# Altium PCB Tracker-NB-IOT-v1.1.PcbDoc (part 3 of 3)
Units mm, origin at the board's own origin, x right, y up, seen from the top; angles counter-clockwise.
Board outline 60 x 36.48 mm, 4 copper layers (Top Layer, Mid Layer 1, Mid Layer 2, Bottom Layer), stack 1.514 mm thick; 117 components, 86 nets, 443 pads, 352 vias.
Unrouted connection lines stored in the file: 3.
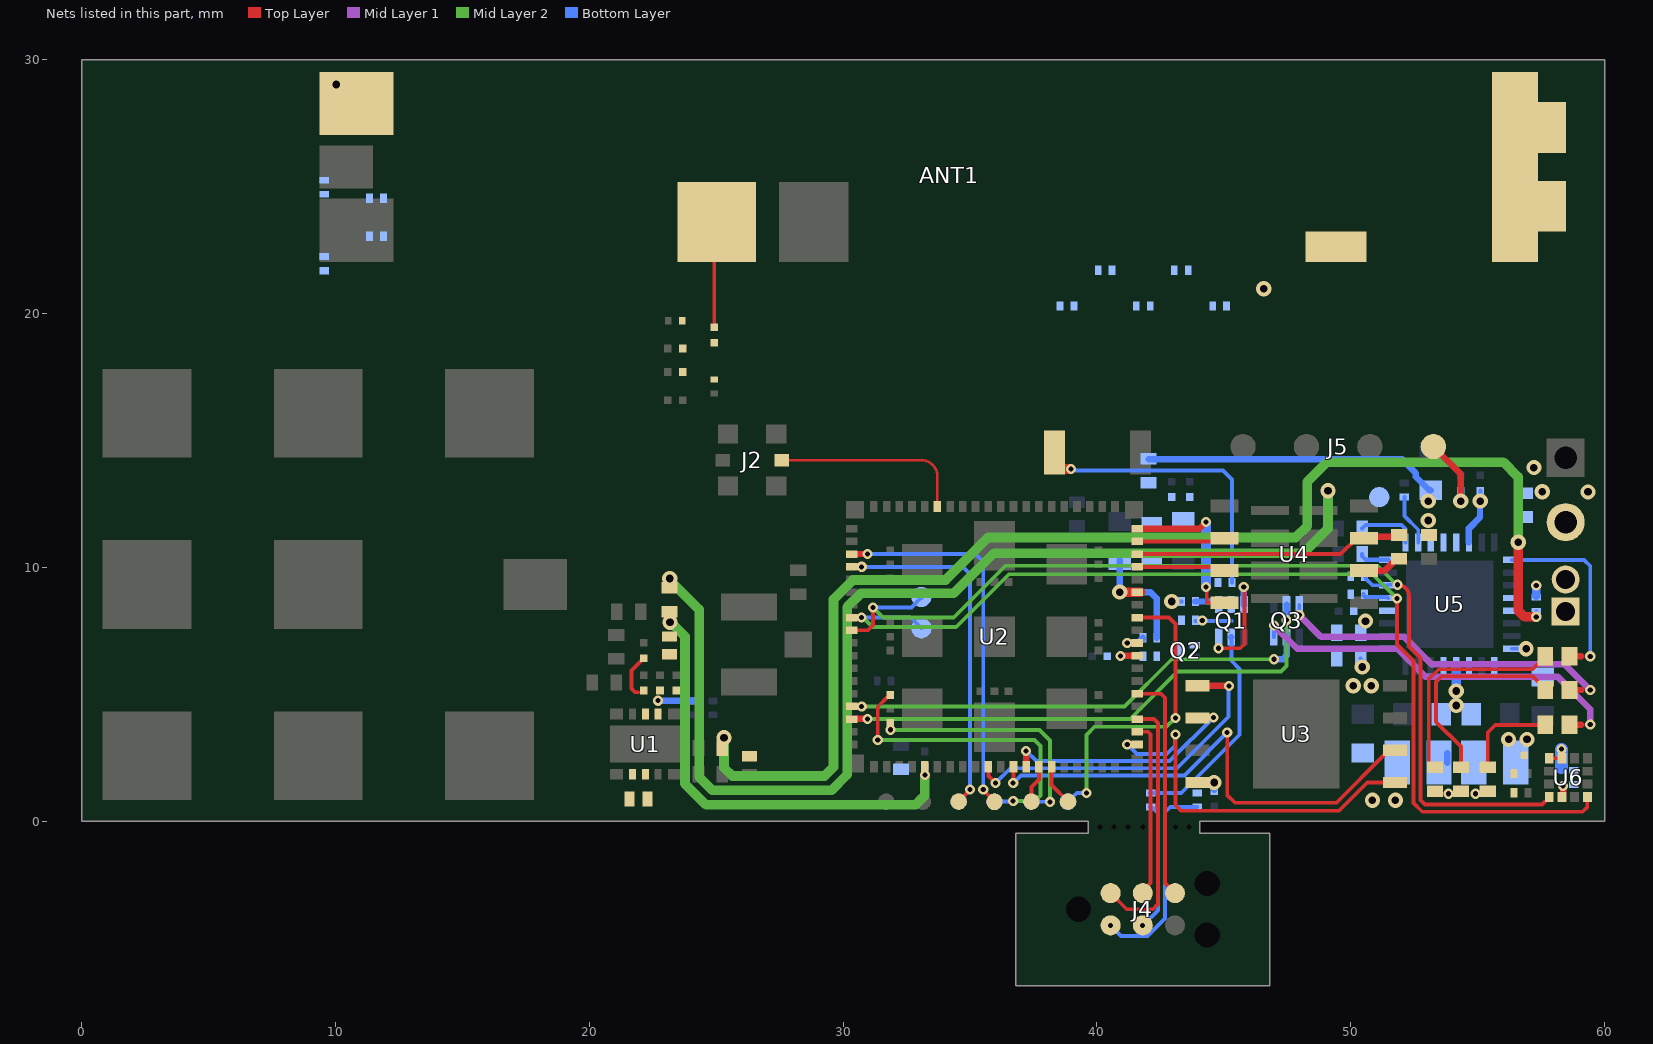
[diagram p4: the nets of this part, all layers, seen from the top]

## Via types
v1: diameter 0.4, hole 0.2, Top Layer to Bottom Layer, tented both sides, 308 vias
v2: diameter 0.6, hole 0.3, Top Layer to Bottom Layer, tented both sides, 30 vias
v3: diameter 0.5, hole 0.25, Top Layer to Bottom Layer, tented both sides, 14 vias

## Nets (pads, with @x,y where several pads share a name; then routed paths per layer and width w, separated by ;. In a path a pad name is that pad's centre, name@x,y a point inside that pad or via, vN(x,y) a via of type N, cw(c..) or ccw(c..) an arc to the next point about the centre after c; other vN are vias at no path point) (continued)
LED1: Q3.2 U2.56 | length 18.8
  Top Layer w0.254: U2.56@30.338,4.523 v1(30.73,4.522)
  Mid Layer 2 w0.152: v1(30.73,4.522) 41.088,4.522 42.946,6.379 v1(46.97,6.379)
  Bottom Layer w0.254: v1(46.97,6.379) 47.322,6.379 47.47,6.528 Q3.2@47.47,7.38
LED2: Q3.5 U2.57 | length 20.3
  Top Layer w0.254: U2.57@30.338,4.023 30.342,4.027 30.955,4.027 v1(30.96,4.031)
  Mid Layer 2 w0.152: v1(30.96,4.031) 41.315,4.031 43.174,5.89 47.252,5.89 47.47,6.108 v1(47.47,7.919)
  Bottom Layer w0.254: v1@47.47,8.071 Q3.5@47.47,8.529
LTE_RF1: J2.1 U2.35 | length 7.7
  Top Layer w0.101: J2.1@27.576,14.224 33.078,14.224 cw(c33.078,13.589) 33.713,13.589 U2.35@33.713,12.398
MEM_CS: U2.2 U3.1 | length 15
  Top Layer w0.152: v1(43.095,3.41) 43.095,0.629 43.311,0.412 49.541,0.412 50.652,1.524 U3.1@51.749,1.524
  Top Layer w0.254: v1@41.196,3.023 U2.2@41.588,3.022
  Bottom Layer w0.152: v1(41.195,3.023) 41.575,2.644 42.749,2.644 43.087,2.981 43.087,3.402 v1(43.095,3.41)
MEM_MISO: U2.72 U3.2 | length 20
  Top Layer w0.152: v1@36.7,1.503 36.706,1.51 36.706,2.141 U2.72@36.713,2.148 ; v1(45.132,3.491) 45.132,1.031 45.438,0.725 49.435,0.725 51.355,2.644 51.355,2.65 51.499,2.794 U3.2@51.749,2.794
  Bottom Layer w0.152: v1@36.7,1.503 36.701,1.503 37.003,1.805 43.446,1.805 v1(45.132,3.491)
  other v1: 36.7,1.5
MEM_MOSI: U2.70 U3.5 | length 13.5
  Top Layer w0.152: U2.70@35.713,2.148 35.721,2.139 35.721,1.783 36.004,1.5 v1(36.008,1.5)
  Top Layer w0.254: U3.5@43.959,5.334 43.965,5.327 45.194,5.327 v1(45.201,5.321)
  Bottom Layer w0.152: v1(36.008,1.5) 36.592,2.085 43.156,2.085 45.185,4.115 45.185,5.306 v1(45.201,5.321)
MEM_SCK: U2.73 U3.6 | length 9.5
  Top Layer w0.254: v1(37.204,2.771) 37.209,2.767 37.209,2.152 U2.73@37.213,2.148 ; U3.6@43.959,4.064 43.971,4.076 44.577,4.076 v1(44.589,4.089)
  Bottom Layer w0.152: v1(37.204,2.771) 37.611,2.364 42.865,2.364 v1(44.589,4.089)
NetANT1_1: ANT1.1 C12.2 L4.2 | length 4.2
  Top Layer w0.152: C12.2@24.919,19.455 24.919,23.499 cw(c25.024,23.499) ANT1.1@25.024,23.604
NetANT1_4: ANT1.4 R7.2 R8.1 R8.2 R9.1 R9.2 R10.1 R10.2
  other v2: 46.574,20.979
NetANT1_5: ANT1.5 R11.2 R12.1 R13.2 R14.1 R14.2
  other v2: 10.024,29.029
NetC6_2: C6.2 C7.2 FB1.1 U1.3 | length 1.7
  Top Layer w0.152: 21.918,5.079 21.798,5.079 21.656,5.221 21.656,5.936 C7.2@22.146,6.427
NetC11_2: C11.2 FB2.2 R5.2 U2.14 | length 5.2
  Top Layer w0.381: v2@40.902,9.022 U2.14@41.588,9.022 U2.14@41.718,9.022
  Bottom Layer w0.254: C11.2@40.898,10.287 v2(40.898,9.025) 42.11,9.025 42.359,8.776 R5.2@42.359,7.222
NetC12_1: C12.1 C16.2 C32.2 L3.2
NetC13_2: C13.2 C14.2 R15.2 U1.2 | length 1.4
  Bottom Layer w0.152: v1@22.708,4.741 v1(22.708,4.747)
  Bottom Layer w0.254: v1@22.708,4.741 R15.2@24.11,4.741
NetC21_2: C21.2 R19.2 U2.9 | length 0.7
  Top Layer w0.254: v1(40.924,6.502) 40.934,6.512 41.578,6.512 U2.9@41.588,6.522
NetJ3_2: J3.2 J6.2 R16.1
NetJ4_1: J4.1 R27.2 | length 8.1
  Top Layer w0.254: v1(40.538,-4.115) J4.1@40.538,-4.106
  Bottom Layer w0.152: v1(40.538,-4.115) 40.942,-4.518 41.996,-4.518 42.684,-3.83 42.684,0.355 42.888,0.559 R27.2@43.945,0.559
NetJ4_3: J4.3 R28.2 | length 5.1
  Top Layer w0.254: v1(41.801,-4.115) 41.801,-4.113 J4.3@41.808,-4.106
  Bottom Layer w0.152: v1(41.801,-4.115) 42.403,-3.513 42.403,0.325 42.228,0.5 42.176,0.5 R28.2@42.117,0.559
NetL2_1: L2.1 U1.7
NetL2_2: L2.2 U1.8
NetLED1_1: LED1.1 R17.1 | length 8.4
  Top Layer w0.152: R17.1@54.342,2.121 54.342,2.937 53.364,3.915 53.364,5.484 53.589,5.709 57.163,5.709 57.419,5.453 57.434,5.453 57.668,5.219 LED1.1@57.668,5.169
NetLED1_2: LED1.2 Q3.6 | length 13.6
  Top Layer w0.254: LED1.2@58.618,5.169 59.083,5.169
  Mid Layer 1 w0.254: v1(47.97,8.122) 48.832,7.261 52.106,7.261 53.19,6.177 58.43,6.177 v1(59.438,5.169)
  Bottom Layer w0.152: v1(47.97,8.122) Q3.6@47.97,8.529
NetLED2_1: LED2.1 R18.1 | length 3.8
  Top Layer w0.152: R18.1@55.397,2.121 55.397,3.49 55.696,3.789 57.653,3.789 LED2.1@57.668,3.804
NetLED2_2: LED2.2 Q3.3 | length 15.4
  Top Layer w0.254: LED2.2@58.618,3.804 59.083,3.804
  Mid Layer 1 w0.254: v1(46.97,7.711) 47.891,6.79 51.846,6.79 52.954,5.682 58.163,5.682 59.438,4.407 v1(59.438,3.804)
  Bottom Layer w0.152: Q3.3@46.97,7.253 v1(46.97,7.711)
NetLED3_1: LED3.1 R38.1 | length 8.6
  Top Layer w0.152: R38.1@53.318,2.121 53.229,2.121 53.077,2.273 53.077,2.362 53.077,5.597 53.468,5.988 57.16,5.988 LED3.1@57.668,6.496
NetLED3_2: LED3.2 U5.25 | length 7.2
  Top Layer w0.254: LED3.2@58.618,6.496 59.083,6.496
  Bottom Layer w0.152: U5.25@56.343,10.295 59.195,10.295 59.438,10.052 v1(59.438,6.496)
NetQ1_3: Q1.3 Q1.6 Q2.1 | length 3.9
  Top Layer w0.152: v1(44.791,6.812) 45.648,6.812 45.813,6.977 45.813,9.205 v1(45.785,9.233)
  Bottom Layer w0.254: v1@45.785,9.106 45.791,9.1 45.791,8.534 Q1.6@45.796,8.529
NetQ1_4: Q1.4 R1.1 R4.2 | length 1
  Bottom Layer w0.254: R1.1@43.88,8.656 44.773,8.656 44.796,8.633 Q1.4@44.796,8.529
NetR5_1: R5.1 U2.10 | length 1.1
  Top Layer w0.254: v1@41.196,7.023 U2.10@41.588,7.022
  Bottom Layer w0.254: v1(41.195,7.023) 41.223,7.051 41.639,7.051 41.751,7.164 41.801,7.164 41.809,7.172 R5.1@41.809,7.222
NetR6_1: R6.1 TP5.1
NetR6_2: R6.2 R7.1
NetR11_1: R11.1 TP6.1
NetR12_2: R12.2 R13.1
NetR24_2: R24.2 TP3.1 U5.18 | length 2
  Bottom Layer w0.152: R24.2@52.112,12.769 52.112,12.028 52.659,11.482 U5.18@52.659,10.98
NetR29_2: R29.2 U5.17 | length 2.4
  Bottom Layer w0.152: R29.2@50.451,11.526 50.451,11.533 50.591,11.672 51.998,11.672 52.159,11.512 U5.17@52.159,10.98
NetR30_2: R30.2 U5.16 | length 1.2
  Bottom Layer w0.152: R30.2@50.451,10.524 50.451,10.448 R30.2@50.604,10.295
  Bottom Layer w0.178: R30.2@50.604,10.295 U5.16@51.474,10.295
NetR34_1: R34.1 U6.2 | length 0.3
  Top Layer w0.152: U6.2@58.322,0.958 U6.2@58.344,0.979 ; v1@58.344,1.371 v1(58.365,1.392) v1@58.366,1.391
  Top Layer w0.254: U6.2@58.366,1.118 v1@58.366,1.391
NetSB1_1: SB1.1 U4.2 | length 1.6
  Top Layer w0.254: U4.2@50.525,9.875 51.348,9.875 51.707,10.234 51.798,10.234 SB1.1@51.9,10.335
NetTP18_1: TP18.1 U2.12 | length 12.2
  Top Layer w0.152: U2.12@41.588,8.022 42.839,8.022 43.089,7.772 v1(43.089,4.064)
  Mid Layer 2 w0.152: v1(39.584,1.11) 39.584,3.394 39.913,3.723 42.748,3.723 v1(43.089,4.064)
  Bottom Layer w0.152: TP18.1@38.861,0.768 39.202,1.11 v1(39.584,1.11)
NetTP23_1: TP23.1 U2.99 | length 12.4
  Top Layer w0.152: v1(31.363,3.199) 31.363,4.51 31.752,4.899 31.789,4.899 U2.99@31.863,4.973
  Mid Layer 2 w0.152: v1(31.363,3.199) 37.541,3.199 37.775,2.965 37.775,1.003 37.568,0.796 v1(36.7,0.796)
  Bottom Layer w0.152: TP23.1@35.959,0.766 35.973,0.779 36.683,0.779 v1(36.7,0.796)
NetTP24_1: TP24.1 U2.101 | length 9.9
  Top Layer w0.152: v1(31.863,3.602) U2.101@31.863,3.873
  Mid Layer 2 w0.152: v1(31.863,3.602) 31.87,3.595 37.73,3.595 38.15,3.175 v1(38.15,0.763)
  Bottom Layer w0.152: TP24.1@37.415,0.774 37.422,0.767 38.147,0.767 v1(38.15,0.763)
nRESET: Q2.3 R2.1 R19.1
RESET: Q1.2 Q1.5 R2.2 R4.1 R28.1 SW4.1 | length 21.6
  Top Layer w0.254: SW4.1@38.322,14.525 38.322,14.156 SW4.1@38.655,13.823
  Top Layer w0.381: SW4.1@38.655,13.873 v1(38.973,13.873)
  Bottom Layer w0.152: v1@38.973,13.823 38.981,13.814 44.969,13.814 45.32,13.462 R4.1@45.32,9.403 ; R28.1@42.117,1.109 43.32,1.109 45.615,3.404 45.615,6.002 45.296,6.321 Q1.2@45.296,7.253 ; R2.2@43.88,7.891 45.296,7.891
  Bottom Layer w0.254: Q1.2@45.292,7.249 Q1.2@45.296,7.253
  other v1: 44.15,7.909
SCL: R32.2 TP22.1 U2.50 U5.14 U6.1 | length 41.4
  Top Layer w0.152: U2.50@30.338,7.523 30.973,7.523 31.182,7.731 31.182,8.423 v1(31.179,8.426) ; v1(51.845,9.317) cw(c51.845,8.866) 52.296,8.866 52.296,6.885 52.751,6.43 52.751,0.833 52.933,0.65 57.539,0.65 57.822,0.933 U6.1@57.822,0.958
  Mid Layer 2 w0.152: v1(31.179,8.426) 31.577,8.028 34.356,8.028 36.394,10.066 51.052,10.066 51.802,9.317 v1(51.845,9.317)
  Bottom Layer w0.152: v1(31.179,8.426) 32.691,8.426 33.049,8.784 TP22.1@33.084,8.784 ; R32.2@50.549,9.651 50.607,9.592 50.607,9.542 50.854,9.295 U5.14@51.474,9.295 51.495,9.317 v1(51.845,9.317)
SDA: R31.2 TP21.1 U2.49 U5.13 U6.4 | length 42.3
  Top Layer w0.152: v1(51.824,8.768) 51.824,6.963 52.471,6.315 52.471,0.717 52.818,0.37 59.128,0.37 59.322,0.565 U6.4@59.322,0.958
  Top Layer w0.254: U2.49@30.338,8.023 v1(30.728,8.023)
  Mid Layer 2 w0.152: v1@30.728,8.031 30.777,8.031 31.157,7.651 34.456,7.651 36.534,9.729 50.863,9.729 v1(51.824,8.768)
  Bottom Layer w0.152: v1(30.728,8.023) 32.663,8.023 TP21.1@33.084,7.602 ; R31.2@50.498,8.948 50.498,8.898 50.557,8.839 51.43,8.839 U5.13@51.474,8.795
SIM_1V8: U2.19 U4.8 | length 6.7
  Top Layer w0.152: v1(44.301,9.233) cw(c44.301,9.207) 44.326,9.207 44.326,8.656 ccw(c44.377,8.656) 44.377,8.605 U4.8@45.025,8.605
  Top Layer w0.254: U2.19@41.588,11.523 44.035,11.523 v1(44.296,11.784)
  Bottom Layer w0.152: v1(44.296,11.784) v1@44.298,11.781 ; v1@44.298,9.235 v1(44.301,9.233)
  Bottom Layer w0.381: v1@44.298,9.235 v1@44.298,11.781
SIM_CLK: U2.18 U4.6 | length 3.3
  Top Layer w0.152: U2.18@41.588,11.022 U4.6@44.898,11.022
SIM_IO: SB1.2 U2.17 U4.3 | length 10.6
  Top Layer w0.152: U2.17@41.588,10.522 49.603,10.522 50.225,11.145 U4.3@50.525,11.145
  Top Layer w0.254: U4.3@50.525,11.145 50.593,11.213 51.837,11.213 SB1.2@51.9,11.275
SIM_RST: U2.16 U4.7 | length 3.5
  Top Layer w0.152: U2.16@41.588,10.022 44.878,10.022 U4.7@45.025,9.875
SW1: L5.2 U5.3
SW2: L6.2 U5.5 | length 0.4
  Bottom Layer w0.254: L6.2@53.809,2.31 L6.2@53.809,2.67
SWDCLK: J4.4 U2.3 | length 7
  Top Layer w0.152: U2.3@41.588,3.522 42.019,3.522 42.117,3.424 42.117,-2.429 41.808,-2.738 J4.4@41.808,-2.836
SWDIO: J4.2 U2.4 | length 10.2
  Top Layer w0.152: J4.2@40.538,-2.836 41.173,-3.471 42.202,-3.471 42.405,-3.268 42.405,3.864 42.247,4.022 U2.4@41.588,4.022
SWO: J4.6 U2.6 | length 9
  Top Layer w0.152: U2.6@41.588,5.022 42.526,5.022 42.684,4.864 42.684,-2.442 J4.6@43.078,-2.836
UART1_CTS: TP9.1 U2.75 | length 1.7
  Top Layer w0.152: U2.75@38.213,2.148 38.213,1.423 TP9.1@38.87,0.766
UART1_RTS: TP7.1 U2.74 | length 1.5
  Top Layer w0.152: TP7.1@37.416,0.794 37.418,0.796 37.418,1.341 37.713,1.635 U2.74@37.713,2.148
UART1_RX: TP19.1 U2.44 | length 14.9
  Top Layer w0.152: v1(35.52,1.242) 35.52,1.224 35.956,0.788 TP19.1@35.963,0.788
  Top Layer w0.254: U2.44@30.338,10.523 30.342,10.527 30.957,10.527 v1(30.961,10.531)
  Bottom Layer w0.152: v1(30.961,10.531) 35.213,10.531 35.52,10.224 v1(35.52,1.242)
UART1_TX: TP20.1 U2.45 | length 13.9
  Top Layer w0.152: TP20.1@34.55,0.796 34.558,0.796 34.993,1.232 v1(34.993,1.25)
  Top Layer w0.254: U2.45@30.338,10.023 v1(30.73,10.022)
  Bottom Layer w0.152: v1(30.73,10.022) 34.715,10.022 34.993,9.744 v1(34.993,1.25)
VBAT: C27.2 J6.1 R16.2 U5.19
  other v2: 53.059,11.845 57.545,12.983 59.348,12.975 57.217,13.931
VBUS: C22.2 J5.1 U5.21 | length 2.6
  Top Layer w0.254: J5.1@53.257,14.759 54.336,13.68 v2(54.336,12.613)
VDD: C20.2 R1.2 R20.2 R27.1 U3.8 | length 1.7
  Top Layer w0.254: U3.8@43.959,1.524 U3.8@43.959,1.524 44.614,1.524 v2(44.615,1.523)
  Bottom Layer w0.152: v2(42.944,8.656) R1.2@43.33,8.656 ; R20.2@50.388,6.404 50.455,6.337 v2(50.455,6.074)
  Bottom Layer w0.254: C20.2@44.615,1.236 v2(44.615,1.523)
VDD_1V8: C28.2 L5.1 R20.1 R23.1 R25.1 U5.1 | length 42.9
  Mid Layer 2 w0.381: v2@23.162,9.511 24.324,8.35 24.324,1.737 24.847,1.214 29.543,1.214 30.158,1.829 30.158,8.432 30.703,8.977 34.349,8.977 35.935,10.563 48.137,10.563 49.103,11.529 v2(49.103,13.019)
  other v2: 56.222,3.221 56.944,3.221 50.102,5.335 50.807,5.335 23.168,9.563
VDD_3V0: C29.2 L6.1 R17.2 R18.2 R33.2 R38.2 U5.28 U5.32 | length 1
  Bottom Layer w0.152: U5.32@56.343,6.795 56.346,6.793 56.907,6.793 v2(56.909,6.791)
  Bottom Layer w0.33: R33.2@57.309,8.873 v1(57.309,9.282)
  other v1: 53.851,1.08 54.916,1.08
  other v2: 50.853,0.823 51.76,0.828
VDD_GNSS: C1.2 L1.2 R33.1 U5.29 | length 49.6
  Top Layer w0.152: C1.2@25.241,2.881 25.241,3.224 v2(25.305,3.288)
  Top Layer w0.381: v2(56.597,10.992) 56.597,8.306 56.851,8.052 v1(57.309,8.052)
  Mid Layer 2 w0.381: v2(25.305,3.288) 25.305,2.104 25.63,1.779 29.261,1.779 29.62,2.137 29.62,8.742 30.382,9.504 34.038,9.504 35.713,11.179 47.833,11.179 48.287,11.634 48.287,13.378 49.056,14.147 56.013,14.147 56.597,13.563 v2(56.597,10.992)
  Bottom Layer w0.152: v1(57.309,8.052) R33.1@57.309,8.27
VDD_GPIO: C17.2 C18.2 FB1.2 R23.2 U2.65 | length 17.7
  Top Layer w0.254: U2.65@33.213,2.148 33.216,2.145 33.216,1.818 v1(33.218,1.815)
  Mid Layer 2 w0.381: v2(23.176,7.841) 23.204,7.841 23.771,7.274 23.771,1.473 24.603,0.641 32.849,0.641 33.218,1.01 v1(33.218,1.815)
VDD_IMCU: C30.2 C31.2 R25.2 R31.1 R32.1 R34.2 R35.1 R36.1 U5.12 U6.9 U6.10 | length 1.6
  Top Layer w0.152: U6.10@57.822,2.478 U6.9@58.322,2.478 ; U6.9@58.308,2.492 v1(58.308,2.836)
  Bottom Layer w0.508: 58.308,2.105 v1(58.308,2.836)
  other v2: 50.582,7.884
VDD_nRF: C8.2 C9.2 C10.2 FB2.1 R39.2
VSYS: C24.2 C25.2 C26.2 R39.1 U5.4 U5.20 | length 12.8
  Bottom Layer w0.254: R39.1@42.033,14.255 52.026,14.255 52.566,13.715 52.566,13.573 53.094,13.044 C26.2@53.158,13.044
  Bottom Layer w0.381: v2@54.158,4.986 54.158,5.037 U5.4@54.158,6.11
  other v2: 54.158,4.559 54.158,5.128 53.059,12.613
VUSB: C23.2 U5.22 | length 2
  Bottom Layer w0.152: v2(55.107,12.613) C23.2@55.107,13.024
  Bottom Layer w0.254: U5.22@54.659,10.98 54.659,11.536 55.094,11.971 v2@55.094,12.4
pads on no net: ANT1.6 ANT1.7 J4.MP1 J4.MP2 J4.MP3 U1. U2.5 U2.8 U2.11 U2.21 U2.22 U2.23 U2.26 U2.27 U2.28 U2.29 U2.31 U2.32 U2.33 U2.37 U2.47 U2.48 U2.58 U2.59 U2.61 U2.62 U2.63 U2.64 U2.69 U2.77 U2.78 U2.81 U2.82 U2.83 U2.84 U2.85 U2.86 U2.87 U2.88 U2.89 U2.90 U2.91 U2.92 U2.93 U2.94 U2.95 U2.96 U2.97 U2.98 U2.100 U2.102 U2.103 U2.104 U3.3 U3.7 U4.0 U4.4 U4.5 U5.7 U5.8 U5.9 U5.10 U5.11 U5.15 U5.26 U5.27

## Polygon pours and split planes (outlines as drawn)
GND on Mid Layer 2 "GND_L03_P022" (solid, pour order 22): 0,18.795 0,13.801 0,0 39.75,0 39.75,-0.476 36.801,-0.476 36.801,-6.477 46.801,-6.477 46.801,-0.478 43.854,-0.478 43.854,0 60,0 60,16.002 58.623,16.002 58.623,18.795
VDD_1V8 on Mid Layer 2 "VDD_1V8_L03_P011" (solid, pour order 11): 57.262,3.541 57.525,3.279 57.525,0.968 49.48,0.968 49.48,5.997 51.406,5.997 51.406,3.541
VDD on Mid Layer 2 "VDD_L03_P013" (solid, pour order 13): 49.48,0.827 49.48,2.295 49.48,5.997 51.406,5.997 51.406,7.018 49.779,7.018 49.779,9.729 42.405,9.729 42.405,0.722 49.375,0.722
VSYS on Mid Layer 2 "VSYS_L03_P016" (solid, pour order 16): 52.77,12.135 53.364,11.54 53.364,4.242 56.28,4.242 56.28,12.498 56.28,13.527 52.77,13.527
VBAT on Mid Layer 2 "VBAT_L03_P019" (solid, pour order 19): 57.833,9.525 59.111,9.525 59.111,11.891 58.471,12.531 58.47,12.53 56.43,12.53 56.43,16.002 60,16.002 60,6.496 57.833,6.496
VDD_IMCU on Mid Layer 2 "VDD_IMCU_L03_P020" (solid, pour order 20): 57.892,4.242 58.512,3.622 58.512,2.538 57.662,2.538 57.662,3.141 57.127,3.676 51.406,3.676 51.406,7.018 49.779,7.018 49.779,9.729 53.364,9.729 53.364,4.242
VDD_3V0 on Mid Layer 2 "VDD_3V0_L03_P001" (solid, pour order 1): 57.873,4.261 58.308,3.826 58.308,2.515 57.668,2.515 57.668,1.624 50.126,1.624 50.066,1.684 48.887,0.506 48.887,0 60,0 60,6.496 57.873,6.496 57.873,9.28 59.11,9.28 59.11,11.89 59.111,11.891 58.471,12.531 56.43,12.531 56.43,12.53 56.43,4.261
VBUS on Bottom Layer "VBUS_L04_P008" (solid, pour order 8): 54.033,10.63 54.033,12.458 53.868,12.624 53.868,13.174 54.784,13.174 54.784,11.988 54.438,11.643 54.438,10.63
SW1 on Bottom Layer "SW1_L04_P006" (solid, pour order 6): 55.703,4.883 55.703,1.45 54.354,1.45 54.354,3.17 54.893,3.17 55.339,3.616 55.339,4.661 54.534,5.466 54.534,6.11 54.784,6.11 54.784,5.76 54.784,6.46 54.784,5.802
GND on Bottom Layer "GND_L04_P021" (solid, pour order 21): 0,18.791 0,13.797 0,-0.004 39.75,-0.004 39.75,-0.479 36.801,-0.479 36.801,-6.481 46.801,-6.481 46.801,-0.481 43.854,-0.481 43.854,-0.004 60,-0.004 60,15.998 58.623,15.998 58.623,18.791
VDD_1V8 on Bottom Layer "VDD_1V8_L04_P002" (solid, pour order 2): 49.677,7.993 49.161,7.993 49.161,11.493 49.677,12.009 49.677,13.324 48.53,13.324 48.53,4.865 51.294,4.865 51.294,5.944 49.677,5.944
VDD_IMCU on Bottom Layer "VDD_IMCU_L04_P018" (solid, pour order 18): 50.236,9.85 50.236,8.467 51.824,8.467 51.824,7.107 49.813,7.107 49.813,9.85
VBAT on Bottom Layer "VBAT_L04_P014" (solid, pour order 14): 57.594,14.321 57.594,13.444 59.348,13.444 60,13.444 60,12.613 56.544,12.613 56.544,14.321
VDD_1V8 on Bottom Layer "VDD_1V8_L04_P012" (solid, pour order 12): 58.335,6.46 58.933,5.863 58.933,2.538 58.092,2.538 57.004,1.45 55.89,1.45 55.89,3.608 58.152,3.608 58.152,4.726 57.333,4.726 56.299,5.76 55.533,5.76 55.533,6.46
VBAT on Bottom Layer "VBAT_L04_P007" (solid, pour order 7): 53.033,10.63 53.033,11.396 52.712,11.718 52.712,12.15 53.245,12.15 53.4,11.995 53.4,10.63
VSYS on Bottom Layer "VSYS_L04_P009" (solid, pour order 9): 53.533,10.63 53.533,11.444 52.448,12.53 52.448,13.806 53.727,13.806 53.727,12.765 54.033,12.458 54.033,10.63
GND on Bottom Layer "GND_L04_P003" (solid, pour order 3): 52.427,3.766 52.427,4.696 53.397,5.666 53.397,6.46 51.369,6.46 51.369,4.865 46.533,4.865 46.533,3.766
SW2 on Bottom Layer "SW2_L04_P005" (solid, pour order 5): 52.614,4.84 52.614,1.45 53.978,1.45 53.978,3.17 53.422,3.17 52.978,3.614 52.978,4.638 53.783,5.443 53.784,6.11 53.533,6.11 53.533,5.76 53.533,6.46 53.533,5.76
GND on Bottom Layer "GND_L04_P004" (solid, pour order 4): 55.408,5.634 55.356,5.582 56.286,5.582 57.277,4.591 58.003,4.591 58.003,3.766 55.89,3.766 55.89,4.696 54.92,5.666 54.92,6.46 55.408,6.46
VDD_IMCU on Top Layer "VDD_IMCU_L01_P015" (solid, pour order 15): 56.299,0.932 56.299,3.049 58.497,3.049 58.497,2.278 57.091,2.278 56.709,1.896 56.709,0.932
GND on Top Layer "GND_L01_P010" (solid, pour order 10): 0,18.795 0,13.801 0,0 39.75,0 39.75,-0.476 36.801,-0.476 36.801,-6.477 46.801,-6.477 46.801,-0.478 43.854,-0.478 43.854,0 60,0 60,16.002 58.623,16.002 58.623,18.795
VBAT on Top Layer "VBAT_L01_P000" (solid, pour order 0): 52.756,12.163 56.255,12.163 56.255,15.591 59.769,15.591 59.769,7.057 57.065,7.057 57.065,11.013 52.757,11.013
GND on Mid Layer 1 "GND_L02_P017" (solid, pour order 17): 0,18.793 0,13.799 0,-0.002 39.75,-0.002 39.75,-0.477 36.801,-0.477 36.801,-6.479 46.801,-6.479 46.801,-0.479 43.854,-0.479 43.854,-0.002 60,-0.002 60,16 58.623,16 58.623,18.793

## Other copper
Top Layer:
  rectangle net GND: 36.601,3.618 36.911,3.81
  region net GND: 35.963,3.777 35.015,3.777 35.015,3.585 35.963,3.585
  region net GND: 35.963,10.927 35.015,10.927 35.015,10.735 35.963,10.735
  rectangle net GND: 36.601,10.768 36.911,10.96
  region net GND: 35.325,7.352 35.015,7.352 35.015,7.16 35.325,7.16
  region net GND: 36.042,7.911 36.042,8.22 35.85,8.22 35.85,7.911
  region net GND: 35.884,7.273 35.884,6.325 36.076,6.325 36.076,7.273
  rectangle net GND: 36.601,7.193 36.911,7.385
  region net GND: 38.175,4.502 37.865,4.502 37.865,4.31 38.175,4.31
  region net GND: 38.892,4.423 38.892,5.37 38.7,5.37 38.7,4.423
  region net GND: 38.734,3.785 38.734,3.475 38.926,3.475 38.926,3.785
  region net GND: 38.175,7.352 37.865,7.352 37.865,7.16 38.175,7.16
  region net GND: 38.892,7.911 38.892,8.22 38.7,8.22 38.7,7.911
  region net GND: 38.734,7.273 38.734,6.325 38.926,6.325 38.926,7.273
  region net GND: 38.175,10.202 37.865,10.202 37.865,10.01 38.175,10.01
  region net GND: 38.892,10.123 38.892,11.07 38.7,11.07 38.7,10.123
  region net GND: 38.734,9.485 38.734,9.175 38.926,9.175 38.926,9.485
  region net GND: 33.192,10.123 33.192,11.07 33,11.07 33,10.123
  region net GND: 33.034,10.123 33.034,9.175 33.226,9.175 33.226,10.123
  rectangle net GND: 33.097,10.043 34.061,10.235
  region net GND: 33.192,7.911 33.192,8.22 33,8.22 33,7.911
  region net GND: 33.034,6.635 33.034,6.325 33.226,6.325 33.226,6.635
  rectangle net GND: 33.751,7.193 34.061,7.385
  rectangle net GND: 33.751,4.343 34.061,4.535
  region net GND: 33.034,3.785 33.034,3.475 33.226,3.475 33.226,3.785
  region net GND: 33.192,4.423 33.192,5.37 33,5.37 33,4.423
  rectangle net VDD_1V8: 22.845,8.965 23.48,9.881
  region net ANT: 24.026,15.875 24.026,16.591 23.825,16.591 23.825,15.875
  rectangle net SIM_1V8: 44.035,8.355 44.585,9.462
  region net VDD_IMCU: 56.515,1.956 56.964,2.405 56.751,2.618 56.302,2.169
  rectangle net NetC13_2: 22.57,4.997 23.609,5.297
  rectangle net NetLED2_2: 58.308,3.444 59.674,4.164
  rectangle net VDD_GPIO: 22.845,7.077 23.48,8.482
  rectangle net GND: 21.996,5.597 23.577,5.897
  rectangle net VDD_GNSS: 26.014,2.36 26.614,3.199
  rectangle net VDD_GNSS: 25.013,2.564 26.614,3.648
  rectangle net GND: 23.108,2.564 24.53,3.199
  region net NetL2_2: 22.345,2.063 22.07,2.063 22.07,0.573 22.345,0.573
  rectangle net NetL2_1: 21.57,0.573 21.845,2.063
  rectangle net GND: 22.57,1.638 22.845,2.752
  rectangle net GND: 20.807,1.638 21.322,2.738
  rectangle net GND: 21.57,3.556 21.845,4.438
  rectangle net GND: 23.094,3.297 23.609,4.438
  rectangle net NetC6_2: 21.996,6.277 23.462,6.577
  rectangle net VDD_3V0: 53.001,0.875 55.766,1.409
  rectangle net VDD_IMCU: 57.647,2.278 58.497,2.753
  rectangle net GND: 58.822,1.293 59.532,2.753
  rectangle net GND: 58.647,2.278 59.497,2.753
  rectangle net VDD_IMCU: 56.808,2.334 58.497,2.753
  rectangle net VDD_IMCU: 56.299,0.932 56.569,2.063
  rectangle net VBAT: 52.757,11.046 53.358,11.845
  rectangle net NetC6_2: 21.57,4.648 22.345,5.297
  rectangle net NetC13_2: 22.57,4.013 22.845,5.297
  rectangle net NetC6_2: 22.07,4.013 22.345,5.297
  rectangle net NetLED1_2: 58.308,4.809 59.674,5.529
  rectangle net NetLED3_2: 58.308,6.136 59.674,6.856
  region net NetANT1_4: 58.474,23.323 58.474,29.529 55.574,29.529 55.574,23.323
  region net NetANT1_4: 58.474,19.979 58.474,23.729 45.924,23.729 45.924,19.979
  region net GND: 58.624,16.002 58.624,18.79 25.654,18.79 25.654,16.002
  region net GND: 23.114,16.002 23.114,18.795 0.814,18.795 0.814,16.002
  region net GND: 23.114,18.545 23.114,20.534 21.424,20.534 21.424,18.545
  region net GND: 24.42,20.295 24.42,20.795 21.424,20.795 21.424,20.295
  region net GND: 30.204,18.594 30.204,20.795 25.654,20.795 25.654,18.594
  region net NetANT1_1: 25.42,21.095 25.42,23.196 24.42,23.196 24.42,21.095
  region net NetANT1_1: 24.17,19.422 24.17,20.022 23.67,20.022 23.67,19.422
  region net NetC12_1: 24.17,18.322 24.17,18.922 23.67,18.922 23.67,18.322
  region net NetC12_1: 24.17,17.376 24.17,17.976 23.67,17.976 23.67,17.376
  region net ANT: 24.17,16.276 24.17,16.876 23.67,16.876 23.67,16.276
  region net NetC12_1: 24.02,17.906 24.02,18.648 23.82,18.648 23.82,17.906
  region net NetC12_1: 25.17,17.576 25.17,17.776 23.67,17.776 23.67,17.576
  region net NetC12_1: 25.17,18.322 25.17,18.922 24.67,18.922 24.67,18.322
  region net NetC12_1: 25.17,17.376 25.17,17.976 24.67,17.976 24.67,17.376
  region net NetANT1_1: 25.069,19.622 25.069,19.822 23.536,19.822 23.536,19.622
  region net NetC12_1: 25.17,18.522 25.17,18.722 23.67,18.722 23.67,18.522
  region net ANT: 24.919,16.476 24.919,16.676 23.67,16.676 23.67,16.476
  region net NetANT1_1: 25.02,19.455 25.02,23.604 24.82,23.604 24.82,19.455
  region net ANT: 25.17,16.276 25.17,16.876 24.67,16.876 24.67,16.276
  region net NetANT1_1: 25.17,19.422 25.17,20.022 24.67,20.022 24.67,19.422
  region net GND: 30.204,20.656 30.204,23.396 28.164,23.396 28.164,20.656
  pour cut-out: 25.925,1.434 ccw(c26.096,1.605) 26.096,1.362 27.723,1.362 ccw(c27.723,2.374) 28.735,2.374 28.735,8.812 ccw(c28.492,8.812) 28.664,8.984 ccw(c28.379,8.699) 28.379,9.102 28.079,9.102 ccw(c28.079,8.699) 27.794,8.984 ccw(c27.966,8.812) 27.723,8.812 27.723,2.881 cw(c27.216,2.881) 27.216,2.374 26.096,2.374 ccw(c26.096,2.131) 25.925,2.303 ccw(c26.209,2.018) 25.807,2.018 25.807,1.718 ccw(c26.209,1.718)
  pour cut-out: 23.433,14.733 23.433,16.36 cw(c23.676,16.36) 23.504,16.531 cw(c23.789,16.247) 23.789,16.649 24.089,16.649 cw(c24.089,16.247) 24.374,16.531 cw(c24.202,16.36) 24.445,16.36 24.445,15.24 ccw(c24.952,15.24) 24.952,14.733 25.803,14.733 cw(c25.803,14.49) 25.975,14.662 cw(c25.69,14.377) 26.093,14.377 26.093,14.077 cw(c25.69,14.077) 25.975,13.792 cw(c25.803,13.964) 25.803,13.721 24.445,13.721 cw(c24.445,14.733)
  pour cut-out: 26.857,13.792 ccw(c27.029,13.964) 27.029,13.721 27.051,13.718 32.385,13.718 32.363,13.715 32.706,13.715 cw(c32.706,13.208) 33.213,13.208 33.213,12.088 ccw(c33.456,12.088) 33.284,11.917 ccw(c33.569,12.201) 33.569,11.799 33.869,11.799 ccw(c33.869,12.201) 34.154,11.917 ccw(c33.982,12.088) 34.225,12.088 34.225,13.715 ccw(c33.213,13.715) 33.213,14.727 32.371,14.73 27.029,14.73 27.029,14.733 ccw(c27.029,14.49) 26.857,14.662 ccw(c27.142,14.377) 26.739,14.377 26.739,14.077 ccw(c27.142,14.077)
  pour cut-out: 27.807,9.382 ccw(c28.092,9.666) 28.092,9.264 28.392,9.264 ccw(c28.392,9.666) 28.677,9.382 ccw(c28.505,9.553) 28.748,9.553 28.748,10.546 cw(c29.255,10.546) 29.255,11.053 30.741,11.053 ccw(c30.741,11.296) 30.913,11.124 ccw(c30.628,11.409) 31.031,11.409 31.031,11.709 ccw(c30.628,11.709) 30.913,11.994 ccw(c30.741,11.822) 30.741,12.065 28.748,12.065 ccw(c28.748,11.053) 27.736,11.053 27.736,9.553 ccw(c27.979,9.553)
  pour cut-out: 35.068,2.602 36.861,2.602 36.861,4.785 35.068,4.785
  pour cut-out: 35.068,9.752 36.861,9.752 36.861,11.935 35.068,11.935
  pour cut-out: 32.218,9.228 34.011,9.228 34.011,11.013 32.218,11.013
  pour cut-out: 37.918,9.228 39.711,9.228 39.711,11.013 37.918,11.013
  pour cut-out: 37.918,6.378 39.711,6.378 39.711,8.163 37.918,8.163
  pour cut-out: 37.918,3.528 39.711,3.528 39.711,5.313 37.918,5.313
  pour cut-out: 32.218,3.528 34.011,3.528 34.011,5.313 32.218,5.313
  pour cut-out: 32.218,6.378 34.011,6.378 34.011,8.163 32.218,8.163
  pour cut-out: 35.068,6.378 36.861,6.378 36.861,8.163 35.068,8.163
  pour cut-out: 24.759,6.114 27.584,6.114 27.584,7.814 24.759,7.814
  pour cut-out: 58.633,16.002 58.633,18.792 60.001,18.792 60.001,16.002
Mid Layer 2:
  rectangle net NetJ3_2: 57.971,9.525 58.971,11.781
Bottom Layer:
  region net NetR6_1: 38.574,19.979 38.574,22.029 37.574,22.029 37.574,19.979
  region net NetR11_1: 11.374,20.759 11.374,21.759 9.374,21.759 9.374,20.759
  region net GND: 53.007,5.793 52.747,5.533 52.846,5.435 53.105,5.694
  region net GND: 55.566,5.537 55.307,5.796 55.208,5.698 55.467,5.439
  region net SW2: 53.211,5.189 52.762,4.74 52.921,4.581 53.37,5.03
  region net SW1: 55.544,4.767 55.095,5.216 54.936,5.057 55.385,4.608
  rectangle net VDD_GPIO: 31.961,1.608 33.424,2.296
  rectangle net NetC11_2: 40.454,9.906 42.56,10.668
  rectangle net VDD_nRF: 41.716,11.387 42.351,13.569
  rectangle net VDD_nRF: 41.71,11.387 43.853,13.01
  rectangle net VDD: 42.868,8.471 43.287,8.841
  rectangle net VDD: 43.76,0.974 44.765,1.244
  rectangle net VDD: 50.159,6.086 50.756,6.721
  rectangle net GND: 38.9,11.387 41.343,11.873
  rectangle net COEX0: 23.932,4.056 25.058,4.326
  rectangle net VDD_3V0: 50.028,0.265 52.36,3.447
  rectangle net NetR34_1: 58.055,1.154 58.98,1.619
  rectangle net VDD_IMCU: 58.055,1.813 58.98,2.278
  rectangle net NetQ1_4: 44.646,8.194 44.946,9.588
  rectangle net NetQ1_3: 43.652,6.805 44.946,7.225
  rectangle net nRESET: 42.224,6.317 43.352,6.687
  rectangle net nRESET: 42.952,6.317 43.465,8.094
  rectangle net RESET: 45.146,6.918 45.446,9.588
  rectangle net NetC21_2: 40.26,6.346 41.809,6.646
  rectangle net VDD_nRF: 41.71,11.387 43.853,12.192
  region net VBAT: 57.09,12.924 57.09,13.608 56.633,13.608 56.633,12.924
  rectangle net VBAT: 56.861,12.695 57.545,13.152
  rectangle net NetJ3_2: 56.544,11.523 58.471,12.383
  rectangle net NetR24_2: 51.123,12.634 52.297,12.904
  region net NetANT1_5: 11.374,23.729 11.374,24.729 9.374,24.729 9.374,23.729
  rectangle net VDD_GNSS: 56.14,8.17 57.495,8.42
  rectangle net VDD_3V0: 56.14,8.67 57.495,8.92
  region net NetANT1_5: 11.374,25.229 11.374,29.529 9.374,29.529 9.374,25.229
  region net NetANT1_4: 44.574,19.979 44.574,22.029 43.574,22.029 43.574,19.979
  region net GND: 58.624,16.002 58.624,18.795 9.226,18.795 9.226,16.002
  region net NetR6_2: 40.074,19.979 40.074,22.029 39.074,22.029 39.074,19.979
  region net NetANT1_4: 41.574,19.979 41.574,22.029 40.574,22.029 40.574,19.979
  region net NetANT1_4: 43.074,19.979 43.074,22.029 42.074,22.029 42.074,19.979
  region net NetANT1_4: 47.074,19.979 47.074,22.029 45.074,22.029 45.074,19.979
  region net NetANT1_4: 47.074,20.879 47.074,21.179 40.574,21.179 40.574,20.879
  region net GND: 30.204,18.395 30.204,20.795 21.424,20.795 21.424,18.395
  region net NetANT1_5: 9.678,22.984 9.678,23.941 9.374,23.941 9.374,22.984
  region net NetANT1_5: 11.374,24.529 11.374,25.454 11.074,25.454 11.074,24.529
  region net NetANT1_5: 11.374,22.229 11.374,23.23 9.374,23.23 9.374,22.229
  region net NetR12_2: 12.874,22.229 12.874,24.729 11.874,24.729 11.874,22.229
  region net VSYS: 54.276,5.507 55.128,4.655 55.128,3.766 53.189,3.766 53.189,4.655 54.041,5.507
  pour cut-out: 58.623,16.002 58.623,18.795 60.001,18.795 60.001,16.002
Multi-Layer:
  pour cut-out: 9.374,30.022 9.374,18.817 0.15,18.817 0.15,30.022
  pour cut-out: 32.715,23.912 32.715,19.69 20.933,19.69 20.933,23.912

## Silkscreen, mask and mechanical layers (free items; w line width, h text height)
Top Overlay:
  lines w0.127: 54.834,14.583 54.624,14.583 ; 54.624,14.583 54.834,14.743 54.834,14.423 54.624,14.583 ; 34.047,0.254 39.355,0.254 39.355,1.385 34.047,1.385 34.047,0.254
  lines w0.254: 38.329,-5.407 39.729,-5.407 ; 43.871,-5.398 45.271,-5.398
  text "NB-IoT ANT" at 52.396,20.428 h1.27
  text "GPS ANT" at 13.163,18.796 h1.27
  text "RESET" at 38.109,16.285 h1.27
  text "POGO" at 44.808,15.924 h1.27
  text "B-" at 55.332,14.002 h1.27
  text "ANT2" at 24.948,11.631 h1.27
  text "B+" at 55.332,10.933 h1.27
  text "EN" at 55.306,8.247 h1.27
  text "LED" at 54.635,5.961 h1.27
  text "DL1" at 54.633,4.633 h1.27
  text "ANT1" at 24.999,3.761 h1.27
  text "DL2" at 54.633,3.285 h1.27
  text "UART" at 39.587,0.268 h1.27
  text "PROG" at 40.095,-6.006 h1.27
Bottom Overlay:
  drawing of 18 lines, arcs and shapes, not listed
  text "NTC" at 50.325,12.243 h1.27
  text "SCL" at 36.338,8.308 h1.27
  text "SDA" at 36.345,7.075 h1.27
Dimensions:
  drawing of 295 lines, arcs and shapes, not listed
  text "Layer" at 75.24,72.72 h1.52
  text "Name" at 85.652,72.72 h1.52
  text "Material" at 109.267,72.72 h1.52
  text "Thickness" at 131.105,72.72 h1.52
  text "Constant" at 147.611,72.72 h1.52
  text "Board Layer Stack" at 162.085,72.72 h1.52
  text "Top Overlay" at 85.652,69.672 h1.52
  text "Top Solder" at 85.652,66.624 h1.52
  text "Solder Resist" at 109.267,66.624 h1.52
  text "0.050mm" at 131.105,66.624 h1.52
  text "3.5" at 147.611,66.624 h1.52
  text "1" at 75.24,63.576 h1.52
  text "Top Layer" at 85.652,63.576 h1.52
  text "0.035mm" at 131.105,63.576 h1.52
  text "Dielectric 2" at 85.652,60.528 h1.52
  text "PP-006" at 109.267,60.528 h1.52
  text "0.072mm" at 131.105,60.528 h1.52
  text "4.1" at 147.611,60.528 h1.52
  text "2" at 75.24,57.48 h1.52
  text "Mid Layer 1" at 85.652,57.48 h1.52
  text "CF-004" at 109.267,57.48 h1.52
  text "0.035mm" at 131.105,57.48 h1.52
  text "Dielectric 1" at 85.652,54.432 h1.52
  text "FR-4" at 109.267,54.432 h1.52
  text "1.230mm" at 131.105,54.432 h1.52
  text "4.8" at 147.611,54.432 h1.52
  text "3" at 75.24,51.384 h1.52
  text "Mid Layer 2" at 85.652,51.384 h1.52
  text "CF-004" at 109.267,51.384 h1.52
  text "0.035mm" at 131.105,51.384 h1.52
  text "Dielectric 3" at 85.652,48.336 h1.52
  text "PP-006" at 109.267,48.336 h1.52
  text "0.072mm" at 131.105,48.336 h1.52
  text "4.1" at 147.611,48.336 h1.52
  text "4" at 75.24,45.288 h1.52
  text "Bottom Layer" at 85.652,45.288 h1.52
  text "0.035mm" at 131.105,45.288 h1.52
  text "Bottom Solder" at 85.652,42.24 h1.52
  text "Solder Resist" at 109.267,42.24 h1.52
  text "0.050mm" at 131.105,42.24 h1.52
  text "3.5" at 147.611,42.24 h1.52
  text "Bottom Overlay" at 85.652,39.192 h1.52
  text "Total board thickness:" at 75.24,36.144 h1.52
  text "1.614mm" at 131.105,36.144 h1.52
Board Outline:
  the board outline again, w0.254
Drill Drawing:
  circle w0.254: c75.53,6.016 r0.847
  lines w0.254: 74.683,9.402 75.107,9.402 75.53,8.979 75.953,9.402 76.377,9.402 75.953,9.826 76.377,10.249 75.953,10.249 75.53,10.672 75.107,10.249 74.683,10.249 75.107,9.826 74.683,9.402 ; 74.683,12.789 75.53,13.212 76.377,12.789 75.953,13.636 76.377,14.482 75.53,14.059 74.683,14.482 75.107,13.636 74.683,12.789 ; 74.683,18.292 76.377,18.292 75.53,16.599 74.683,18.292 ; 74.683,20.409 76.377,20.409 76.377,22.102 74.683,22.102 74.683,20.409 ; 74.683,24.219 74.683,24.642 75.107,25.066 74.683,25.489 74.683,25.912 75.107,25.912 75.53,25.489 75.953,25.912 76.377,25.912 76.377,25.489 75.953,25.066 76.377,24.642 76.377,24.219 75.953,24.219 75.53,24.642 75.107,24.219 74.683,24.219 ; 74.683,28.452 75.107,28.452 75.107,28.029 75.953,28.029 75.953,28.452 76.377,28.452 76.377,29.299 75.953,29.299 75.953,29.722 75.107,29.722 75.107,29.299 74.683,29.299 74.683,28.452
  lines w0.381: 73.165,4.026 343.447,4.026 ; 73.165,30.696 343.447,30.696 ; 87.157,0.216 87.157,34.506 ; 102.393,0.216 102.393,34.506 ; 130.325,0.216 130.325,34.506 ; 143.174,0.216 143.174,34.506 ; 161.813,0.216 161.813,34.506 ; 199.901,0.216 199.901,34.506 ; 214.883,0.216 214.883,34.506 ; 233.827,0.216 233.827,34.506 ; 252.871,0.216 252.871,34.506 ; 274.557,0.216 274.557,34.506 ; 308.431,0.216 308.431,34.506 ; 73.165,0.216 343.447,0.216 343.447,34.506 73.165,34.506 73.165,0.216
  text "Symbol" at 75.451,31.839 h1.83
  text "Count" at 88.3,31.839 h1.83
  text "Hole Size" at 103.536,31.839 h1.83
  text "Plated" at 131.468,31.839 h1.83
  text "Hole Type" at 144.317,31.839 h1.83
  text "Drill Layer Pair" at 162.956,31.839 h1.83
  text "Via/Pad" at 201.044,31.839 h1.83
  text "Pad Shape" at 216.026,31.839 h1.83
  text "Template" at 234.97,31.839 h1.83
  text "Description" at 254.014,31.839 h1.83
  text "Hole Tolerance (+)" at 275.7,31.839 h1.83
  text "Hole Tolerance (-)" at 309.574,31.839 h1.83
  text "2" at 88.3,28.029 h1.52
  text "29.53mil (0.750mm)" at 103.536,28.029 h1.52
  text "PTH" at 131.468,28.029 h1.52
  text "Round" at 144.317,28.029 h1.52
  text "Top Layer - Bottom Layer" at 162.956,28.029 h1.52
  text "Pad" at 201.044,28.029 h1.52
  text "(Mixed)" at 216.026,28.029 h1.52
  text "(Mixed)" at 234.97,28.029 h1.52
  text "2" at 88.3,24.219 h1.52
  text "35.43mil (0.900mm)" at 103.536,24.219 h1.52
  text "PTH" at 131.468,24.219 h1.52
  text "Round" at 144.317,24.219 h1.52
  text "Top Layer - Bottom Layer" at 162.956,24.219 h1.52
  text "Pad" at 201.044,24.219 h1.52
  text "(Mixed)" at 216.026,24.219 h1.52
  text "(Mixed)" at 234.97,24.219 h1.52
  text "3" at 88.3,20.409 h1.52
  text "39.02mil (0.991mm)" at 103.536,20.409 h1.52
  text "PTH" at 131.468,20.409 h1.52
  text "Round" at 144.317,20.409 h1.52
  text "Top Layer - Bottom Layer" at 162.956,20.409 h1.52
  text "Pad" at 201.044,20.409 h1.52
  text "Rounded" at 216.026,20.409 h1.52
  text "c0h99" at 234.97,20.409 h1.52
  text "6" at 88.3,16.599 h1.52
  text "7.87mil (0.200mm)" at 103.536,16.599 h1.52
  text "NPTH" at 131.468,16.599 h1.52
  text "Round" at 144.317,16.599 h1.52
  text "Top Layer - Bottom Layer" at 162.956,16.599 h1.52
  text "Pad" at 201.044,16.599 h1.52
  text "Rounded" at 216.026,16.599 h1.52
  text "c0hn20" at 234.97,16.599 h1.52
  text "14" at 88.3,12.789 h1.52
  text "9.84mil (0.250mm)" at 103.536,12.789 h1.52
  text "PTH" at 131.468,12.789 h1.52
  text "Round" at 144.317,12.789 h1.52
  text "Top Layer - Bottom Layer" at 162.956,12.789 h1.52
  text "Via" at 201.044,12.789 h1.52
  text "Rounded" at 216.026,12.789 h1.52
  text "v50h25m0mx0" at 234.97,12.789 h1.52
  text "30" at 88.3,8.979 h1.52
  text "11.81mil (0.300mm)" at 103.536,8.979 h1.52
  text "PTH" at 131.468,8.979 h1.52
  text "Round" at 144.317,8.979 h1.52
  text "Top Layer - Bottom Layer" at 162.956,8.979 h1.52
  text "Via" at 201.044,8.979 h1.52
  text "Rounded" at 216.026,8.979 h1.52
  text "v60h30m0mx0" at 234.97,8.979 h1.52
  text "308" at 88.3,5.169 h1.52
  text "7.87mil (0.200mm)" at 103.536,5.169 h1.52
  text "PTH" at 131.468,5.169 h1.52
  text "Round" at 144.317,5.169 h1.52
  text "Top Layer - Bottom Layer" at 162.956,5.169 h1.52
  text "Via" at 201.044,5.169 h1.52
  text "Rounded" at 216.026,5.169 h1.52
  text "v40h20m0mx0" at 234.97,5.169 h1.52
  text "365 Total" at 88.3,1.359 h1.52

## Dimensions
0,30 to 60,30 on Dimensions
0,30 to 0,0.002 on Dimensions